# Altium PCB RTL8316_STAND.PcbDoc (part 3 of 4)
Units mm, origin at the board's own origin, x right, y up, seen from the top; angles counter-clockwise.
Board outline 155 x 217 mm, 4 copper layers (Top, Ground, Power, Bottom), stack 1.012 mm thick; 305 components, 396 nets, 1247 pads, 345 vias.
Unrouted connection lines stored in the file: 59.
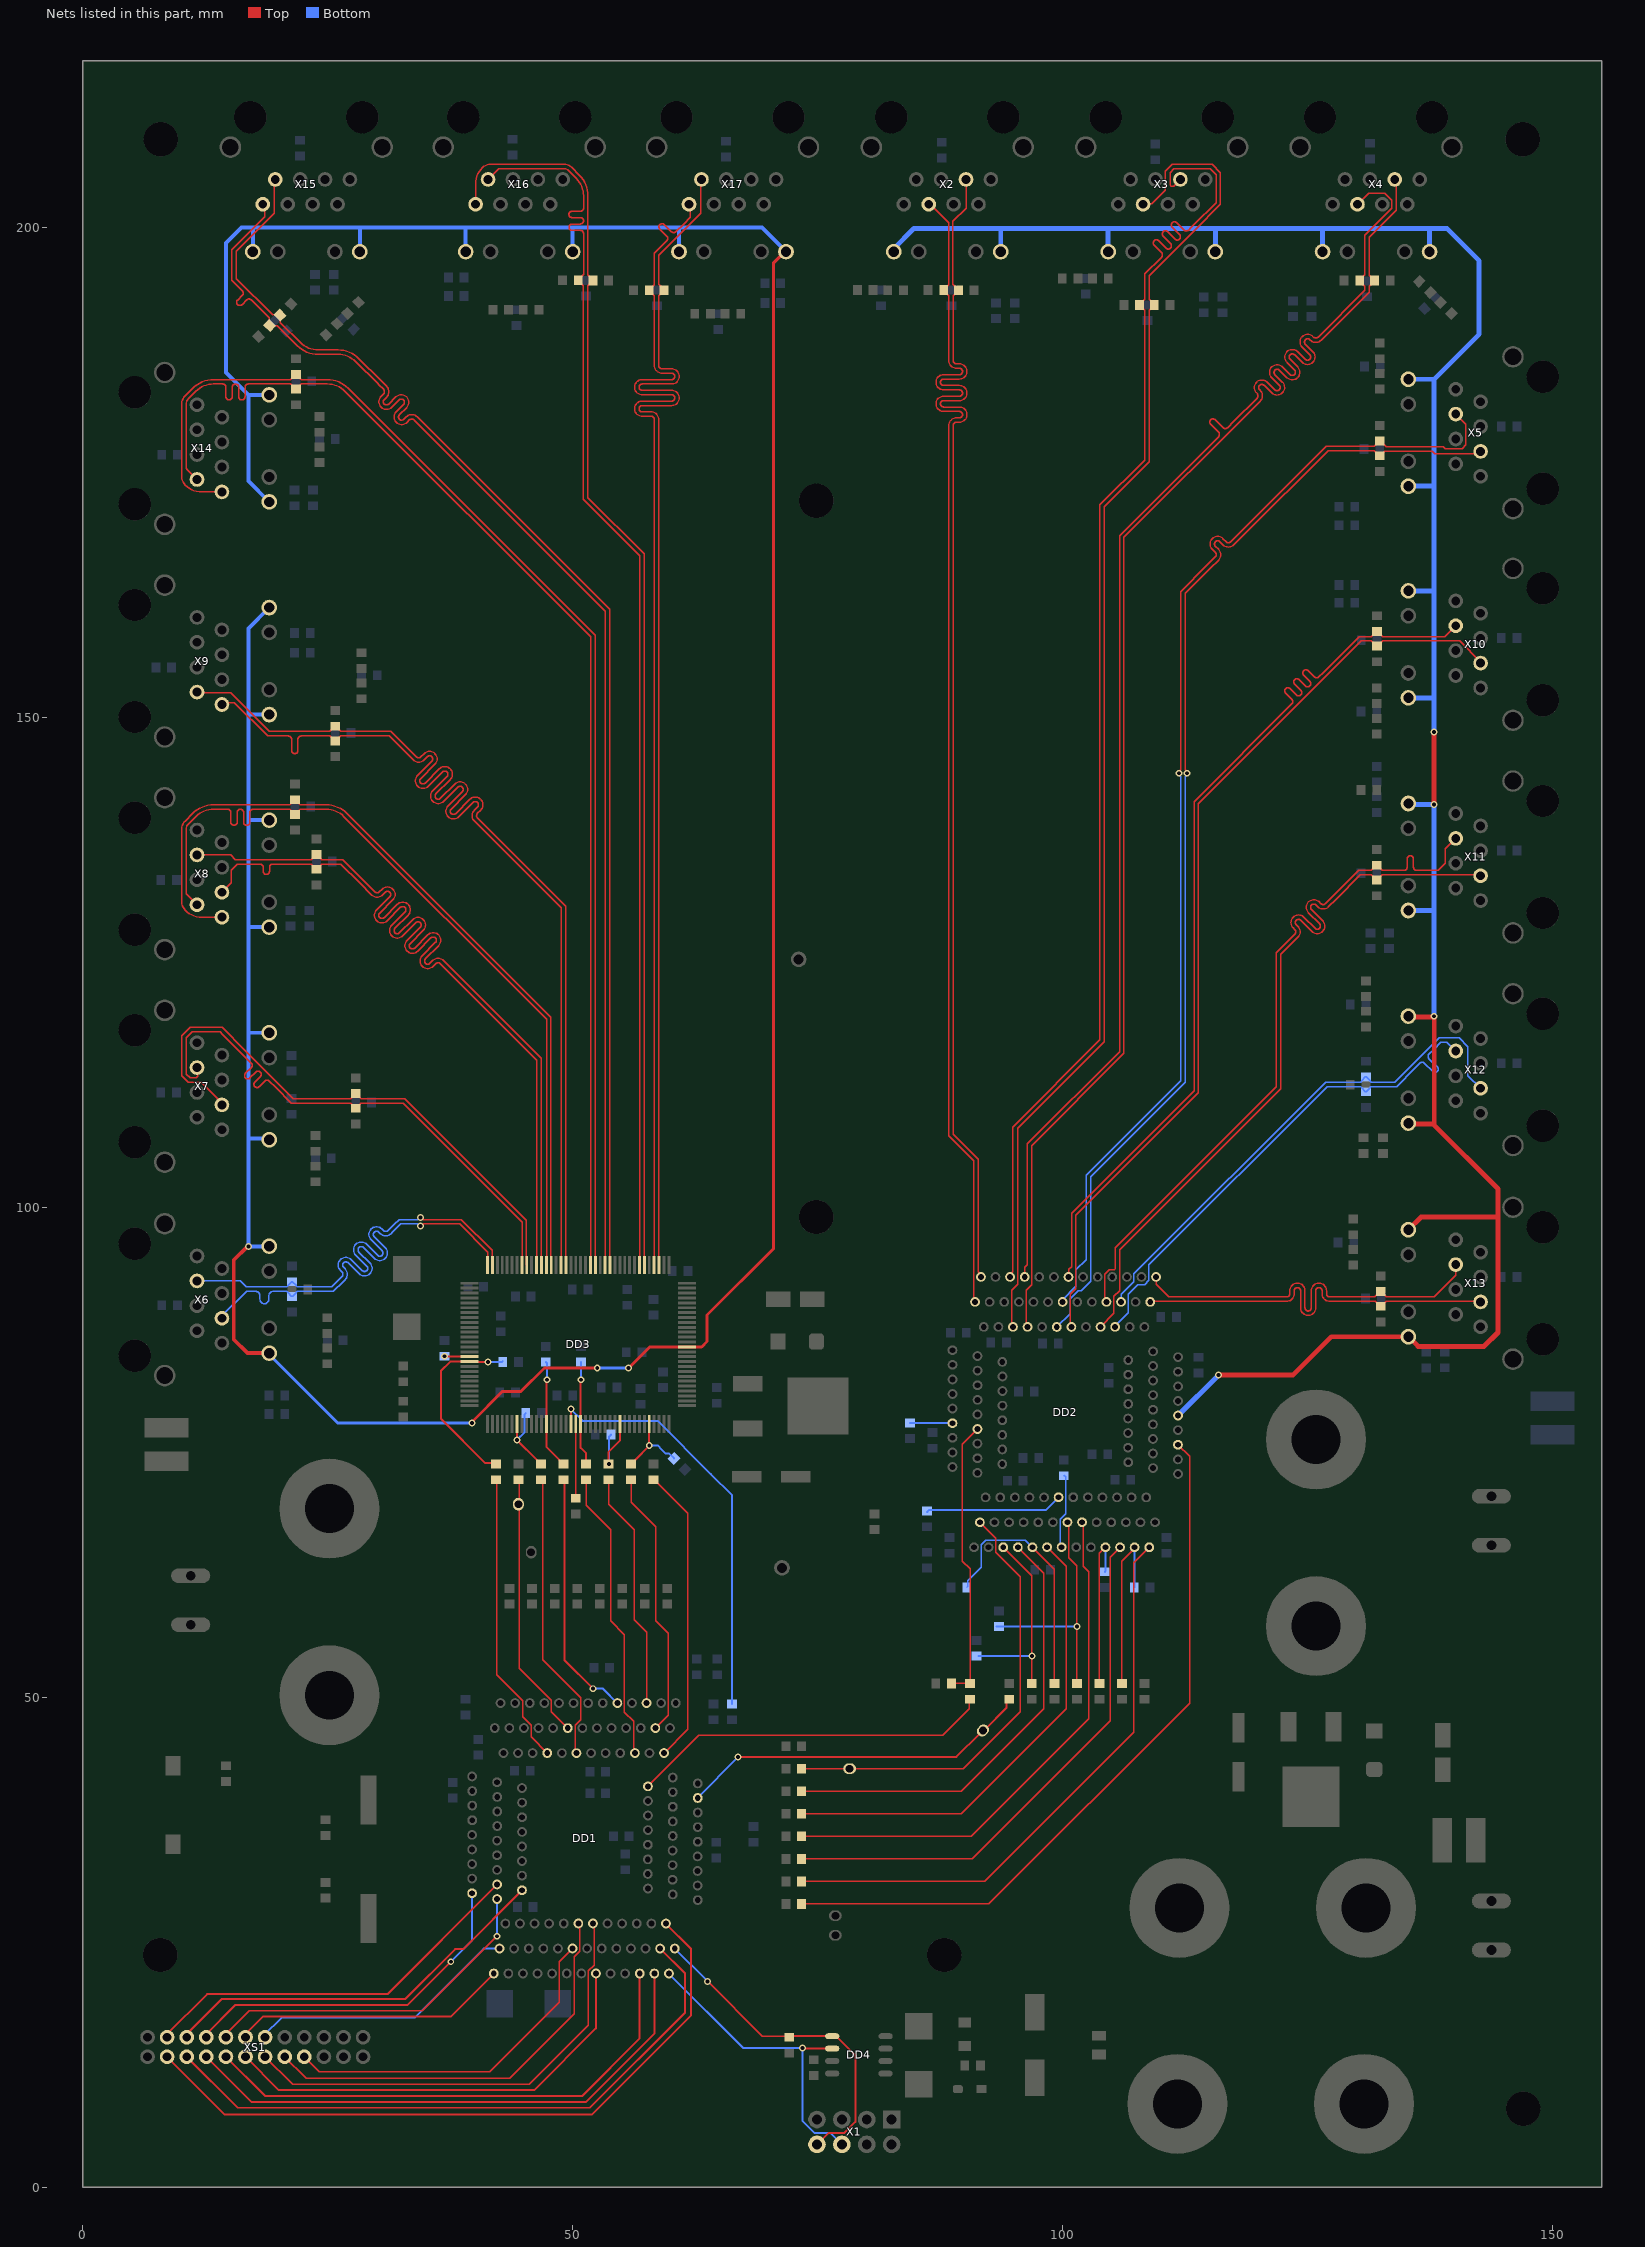
[diagram p5: the nets of this part, all layers, seen from the top]

## Via types
v1: diameter 0.7, hole 0.4, Top to Bottom, tented both sides, 332 vias
v2: diameter 1.2, hole 0.6, Top to Bottom, tented both sides, 11 vias
v3: diameter 0.9, hole 0.4, Top to Bottom, tented both sides, 2 vias

## Nets (pads, with @x,y where several pads share a name; then routed paths per layer and width w, separated by ;. In a path a pad name is that pad's centre, name@x,y a point inside that pad or via, vN(x,y) a via of type N, cw(c..) or ccw(c..) an arc to the next point about the centre after c; other vN are vias at no path point) (continued)
RX5_N: DD3.27 R104.1 X8.6 | length 85.1
  Top w0.15: X8.6@11.65,135.96 15.09,135.96 15.575,135.475 23.244,135.475 ccw(c23.244,135.7) 23.403,135.541 ccw(c23.35,135.594) 23.425,135.594 cw(c23.5,135.594) 23.447,135.647 23.765,135.965 cw(c23.85,135.879) R104.1@23.85,136 cw(c23.85,135.879) 23.935,135.965 24.253,135.647 cw(c24.2,135.594) 24.275,135.594 ccw(c24.35,135.594) 24.297,135.541 24.319,135.519 ccw(c24.425,135.625) 24.425,135.475 26.511,135.475 28.568,133.418 29.8,132.187 ccw(c30.029,132.417) 30.259,132.187 30.542,132.47 cw(c31.09,131.922) 31.638,132.47 cw(c31.09,131.922) 31.638,131.374 ; 31.637,131.373 30.295,130.03 ccw(c30.524,129.8) 30.295,129.57 ccw(c30.524,129.8) 30.754,129.57 32.098,130.914 cw(c32.646,130.366) 33.194,130.914 cw(c32.646,130.366) 33.194,129.818 ; 33.193,129.817 31.85,128.474 ccw(c32.08,128.245) 31.85,128.015 ccw(c32.08,128.245) 32.309,128.014 33.653,129.358 cw(c34.201,128.81) 34.749,129.358 cw(c34.201,128.81) 34.749,128.262 ; 34.749,128.261 33.406,126.919 ccw(c33.636,126.689) 33.406,126.459 ccw(c33.636,126.689) 33.865,126.459 35.209,127.803 cw(c35.757,127.255) 36.305,127.803 cw(c35.757,127.255) 36.305,126.707 ; 36.304,126.706 34.962,125.363 ccw(c35.191,125.133) 34.962,124.904 ccw(c35.191,125.133) 35.421,124.903 35.704,125.186 cw(c36.252,124.638) 36.8,125.186 37.012,124.974 46.775,115.211 46.775,94.125 DD3.27@46.8,94.1
RX5_P: DD3.28 R103.1 X8.3 | length 85.1
  Top w0.15: X8.3@14.19,132.15 15.165,133.125 15.165,134.415 15.775,135.025 17.35,135.025 18.075,135.025 cw(c18.075,134.7) 18.4,134.7 18.4,134.301 ccw(c18.725,134.301) 18.725,133.976 ccw(c18.725,134.301) 19.05,134.301 19.05,134.7 cw(c19.375,134.7) 19.375,135.025 20.65,135.025 23.244,135.025 cw(c23.244,134.8) 23.403,134.959 cw(c23.35,134.906) 23.425,134.906 ccw(c23.5,134.906) 23.447,134.853 R103.1@23.765,134.535 ; R103.1@23.765,134.535 ccw(c23.85,134.621) R103.1@23.85,134.5 ccw(c23.85,134.621) R103.1@23.935,134.535 ; R103.1@23.935,134.535 24.253,134.853 ccw(c24.2,134.906) 24.275,134.906 cw(c24.35,134.906) 24.297,134.959 24.319,134.981 cw(c24.425,134.875) 24.425,135.025 26.325,135.025 28.25,133.1 29.48,131.87 ccw(c30.029,132.417) 30.577,131.869 30.86,132.151 cw(c31.09,131.922) 31.32,132.151 cw(c31.09,131.922) 31.32,131.692 29.976,130.348 ccw(c30.524,129.8) 29.976,129.252 ccw(c30.524,129.8) 31.072,129.252 32.416,130.596 cw(c32.646,130.366) 32.876,130.596 cw(c32.646,130.366) 32.876,130.137 31.532,128.793 ccw(c32.08,128.245) 31.532,127.697 ccw(c32.08,128.245) 32.628,127.697 33.972,129.04 cw(c34.201,128.81) 34.431,129.04 cw(c34.201,128.81) 34.432,128.581 33.088,127.237 ccw(c33.636,126.689) 33.088,126.141 ccw(c33.636,126.689) 34.184,126.141 35.527,127.484 cw(c35.757,127.255) 35.987,127.484 cw(c35.757,127.255) 35.987,127.025 34.643,125.681 ccw(c35.191,125.133) 34.643,124.585 ccw(c35.191,125.133) 35.739,124.585 ; 35.74,124.586 36.022,124.868 cw(c36.252,124.638) 36.482,124.868 36.694,124.656 46.325,115.025 46.325,94.125 DD3.28@46.3,94.1
RX6: DD1.124 R57.1 TP3.1 | length 37
  Top w0.2: v1(66.85,43.9) 89.15,43.9 91.578,46.328 91.328,46.578 91.502,46.752 TP3.1@91.654,46.904 ; TP3.1@91.65,46.7 92.05,46.7 94.25,48.9 94.25,49.5 R57.1@94.55,49.8
  Bottom w0.2: DD1.124@62.75,39.715 62.75,39.757 66.85,43.857 v1(66.85,43.9)
RX6_N: DD3.31 R100.1 X7.6 | length 58.3
  Top w0.15: X7.6@11.65,114.26 11.723,114.187 11.723,113.373 11.55,113.2 10.95,113.2 10.55,113.6 10.55,117.3 11.15,117.9 14.014,117.9 14.232,117.682 16.532,115.382 16.682,115.232 17.194,114.719 cw(c16.965,114.489) 17.194,114.26 16.593,113.658 ccw(c16.823,113.429) 16.593,113.199 ccw(c16.823,113.429) 17.053,113.199 17.654,113.8 cw(c17.884,113.57) 18.114,113.8 cw(c17.884,113.57) 18.114,113.34 17.546,112.772 ccw(c17.775,112.542) 17.546,112.313 ccw(c17.775,112.542) 18.005,112.313 18.573,112.881 cw(c18.803,112.651) 19.033,112.881 19.682,112.232 21.289,110.625 27.244,110.625 cw(c27.244,110.4) 27.403,110.559 cw(c27.35,110.506) 27.425,110.506 ccw(c27.5,110.506) 27.447,110.453 27.765,110.135 ccw(c27.85,110.221) R100.1@27.85,110.1 ccw(c27.85,110.221) R100.1@27.935,110.135 ; R100.1@27.935,110.135 28.253,110.453 ccw(c28.2,110.506) 28.275,110.506 cw(c28.35,110.506) 28.297,110.559 ; 28.297,110.559 28.319,110.581 cw(c28.425,110.475) 28.425,110.625 32.689,110.625 44.825,98.489 44.825,94.125 DD3.31@44.8,94.1
RX6_P: DD3.30 R99.1 X7.3 | length 58.3
  Top w0.15: X7.3@14.19,110.45 14.19,110.66 12.1,112.75 10.764,112.75 10.1,113.414 10.1,117.486 10.964,118.35 14.2,118.35 16.532,116.018 16.85,115.7 21.475,111.075 27.244,111.075 ccw(c27.244,111.3) 27.403,111.141 ccw(c27.35,111.194) 27.425,111.194 cw(c27.5,111.194) 27.447,111.247 27.765,111.565 cw(c27.85,111.479) R99.1@27.85,111.6 cw(c27.85,111.479) R99.1@27.935,111.565 ; R99.1@27.935,111.565 28.253,111.247 cw(c28.2,111.194) 28.275,111.194 ccw(c28.35,111.194) 28.297,111.141 28.319,111.119 ccw(c28.425,111.225) 28.425,111.075 32.875,111.075 45.275,98.675 45.275,94.125 DD3.30@45.3,94.1
RX7: DD1.126 R64.1 | length 37.1
  Top w0.15: DD1.126@57.665,40.905 62.86,46.1 87.75,46.1 90.45,48.8 R64.1@90.45,49.871
RX7_N: DD3.37 R96.1 X6.6 | length 47.2
  Top w0.15: v1(34.45,98.95) 34.599,98.95 34.799,98.75 38.636,98.75 41.775,95.611 41.775,94.125 DD3.37@41.8,94.1
  Bottom w0.15: X6.6@11.65,92.485 16.065,92.485 16.675,91.875 20.744,91.875 ccw(c20.744,92.1) 20.903,91.941 ccw(c20.85,91.994) 20.925,91.994 cw(c21,91.994) 20.947,92.047 21.265,92.365 cw(c21.35,92.279) R96.1@21.35,92.4 cw(c21.35,92.279) 21.435,92.365 21.753,92.047 cw(c21.7,91.994) 21.775,91.994 ccw(c21.85,91.994) 21.797,91.941 21.819,91.919 ccw(c21.925,92.025) 21.925,91.875 25.389,91.875 26.232,92.718 26.444,92.93 ccw(c26.211,93.163) 26.443,93.396 ; 26.443,93.397 26.289,93.551 cw(c26.84,94.101) 26.288,94.651 26.291,94.654 cw(c26.84,94.101) 27.391,94.652 28.505,93.538 ccw(c28.737,93.771) 28.97,93.538 ccw(c28.737,93.771) 28.97,94.003 27.856,95.117 cw(c28.407,95.668) 27.855,96.218 27.857,96.221 cw(c28.407,95.668) 28.958,96.219 30.072,95.105 ccw(c30.304,95.338) 30.537,95.105 ccw(c30.304,95.338) 30.537,95.57 29.423,96.684 cw(c29.974,97.235) 29.421,97.785 29.424,97.788 cw(c29.974,97.235) 30.525,97.786 30.679,97.631 ccw(c30.912,97.864) 31.145,97.631 31.405,97.891 31.639,98.125 31.785,98.271 32.264,98.75 34.101,98.75 34.301,98.95 v1(34.45,98.95)
RX7_P: DD3.38 R95.1 X6.3 | length 46.7
  Top w0.15: v1(34.45,98.1) 34.599,98.1 34.799,98.3 38.45,98.3 41.325,95.425 41.325,94.125 DD3.38@41.3,94.1
  Bottom w0.15: X6.3@14.19,88.675 14.19,88.94 16.65,91.4 16.675,91.425 17.625,91.425 cw(c17.625,90.975) 18.075,90.975 18.075,90.605 ccw(c18.525,90.605) 18.525,90.155 ccw(c18.525,90.605) 18.975,90.605 18.975,90.975 cw(c19.425,90.975) 19.425,91.425 20.744,91.425 20.775,91.423 cw(c20.744,91.2) 20.85,91.398 cw(c20.744,91.2) 20.903,91.359 cw(c20.85,91.306) 20.925,91.306 ccw(c21,91.306) 20.947,91.253 21.265,90.935 ccw(c21.35,91.021) R95.1@21.35,90.9 ccw(c21.35,91.021) 21.435,90.935 21.753,91.253 ccw(c21.7,91.306) 21.775,91.306 cw(c21.85,91.306) 21.797,91.359 21.819,91.381 cw(c21.925,91.275) 21.925,91.425 25.575,91.425 26.55,92.4 26.762,92.612 ccw(c26.211,93.163) 26.828,93.639 26.828,93.648 26.763,93.713 ; 26.762,93.714 26.607,93.869 cw(c26.84,94.101) 26.607,94.334 cw(c26.84,94.101) 27.073,94.334 28.187,93.22 ccw(c28.737,93.771) 29.287,93.219 29.29,93.221 ccw(c28.737,93.771) 29.288,94.322 28.174,95.436 cw(c28.407,95.668) 28.174,95.901 cw(c28.407,95.668) 28.639,95.901 29.753,94.787 ccw(c30.304,95.338) 30.854,94.785 30.857,94.788 ccw(c30.304,95.338) 30.855,95.889 29.741,97.003 cw(c29.974,97.235) 29.741,97.468 cw(c29.974,97.235) 30.206,97.468 30.361,97.313 ccw(c30.912,97.864) 31.463,97.313 31.591,97.441 31.957,97.807 32.103,97.953 32.45,98.3 34.101,98.3 34.301,98.1 v1(34.45,98.1)
RX8: DD1.3 R48.1 | length 30.4
  Top w0.15: R48.1@58.25,72.2 58.3,72.2 58.675,71.825 61.75,68.75 61.75,46.735 DD1.3@59.315,44.3
RX8_N: DD2.2 R124.1 X13.6 | length 40.8
  Top w0.15: DD2.2@108.935,90.35 108.985,90.4 122.55,90.4 122.85,90.4 ccw(c122.85,91.175) 123.625,91.175 123.625,91.481 cw(c123.95,91.481) 124.275,91.481 124.275,89.737 ccw(c125.05,89.737) 125.825,89.737 125.825,91.481 cw(c126.15,91.481) 126.475,91.481 126.475,91.175 ccw(c127.25,91.175) 127.25,90.4 128.15,90.4 131.9,90.4 132.4,89.9 R124.1@132.45,89.9 132.5,89.9 133.025,90.425 142.565,90.425 X13.6@142.65,90.34
RX8_P: DD2.1 R123.1 X13.3 | length 40.9
  Top w0.15: DD2.1@109.53,92.9 109.53,92.12 110.8,90.85 118.582,90.85 122.55,90.85 122.85,90.85 ccw(c122.85,91.175) 123.175,91.175 123.175,91.481 cw(c123.95,91.481) 124.725,91.481 124.725,89.737 ccw(c125.05,89.737) 125.375,89.737 125.375,91.481 cw(c126.15,91.481) 126.925,91.481 126.925,91.175 ccw(c127.25,91.175) 127.25,90.85 128.15,90.85 131.85,90.85 132.4,91.4 R123.1@132.45,91.4 132.5,91.4 133.025,90.875 137.925,90.875 140.11,93.06 X13.3@140.11,94.15
RX9: DD1.5 R54.1 | length 27.5
  Top w0.15: R54.1@55.95,72.2 55.95,69.9 58.45,67.4 58.45,57.8 59.745,56.505 59.745,48.17 DD1.5@58.425,46.85
RX9_N: DD2.8 R120.1 X12.6 | length 53.1
  Bottom w0.15: DD2.8@105.955,90.35 105.955,91.105 107.275,92.425 107.275,93.225 126.825,112.775 130.438,112.775 130.526,112.863 130.526,112.925 130.901,113.3 R120.1@130.951,113.3 131.001,113.3 131.376,112.925 131.376,112.862 131.464,112.775 133.888,112.775 138.414,117.3 139.396,117.3 140.45,117.3 141.35,116.4 141.35,113.44 X12.6@142.65,112.14
RX9_P: DD2.9 R119.1 X12.3 | length 52.9
  Bottom w0.15: DD2.9@105.355,87.8 105.355,87.905 106.7,89.25 106.7,91.15 107.65,92.1 108.35,92.1 108.805,92.555 108.805,94.119 127.011,112.325 130.437,112.325 130.525,112.237 130.525,112.175 130.9,111.8 R119.1@130.95,111.8 131,111.8 131.375,112.175 131.375,112.237 131.463,112.325 134.075,112.325 135.95,114.2 136.463,114.713 cw(c136.692,114.483) 136.922,114.713 137.771,113.864 ccw(c138.001,114.094) 138.231,113.864 ccw(c138.001,114.094) 138.231,114.323 137.382,115.172 cw(c137.612,115.402) 137.382,115.632 137.85,116.1 138.6,116.85 139.21,116.85 X12.3@140.11,115.95
RX10: DD1.7 R59.1 | length 24.4
  Top w0.15: R59.1@53.65,72.2 53.65,69.7 56.25,67.1 56.25,57.9 57.53,56.62 DD1.7@57.53,49.4
RX10_N: DD2.12 R116.1 X11.6 | length 76.1
  Top w0.15: DD2.12@103.865,87.8 105.23,89.165 105.23,90.905 105.825,91.5 105.825,95.675 122.25,112.1 122.25,125.8 123.8,127.35 124.012,127.562 ccw(c123.464,128.11) 124.012,128.658 123.838,128.832 cw(c124.069,129.061) 123.839,129.291 cw(c124.069,129.061) 124.299,129.29 ; 124.3,129.29 125.43,128.159 ; 125.431,128.159 ccw(c125.979,128.706) 126.527,128.158 ccw(c125.979,128.706) 126.593,129.179 126.593,129.188 126.528,129.254 125.394,130.387 cw(c125.624,130.617) 125.395,130.847 cw(c125.624,130.617) 125.855,130.846 ; 125.855,130.846 126.026,130.674 ccw(c126.575,131.221) 127.123,130.673 127.9,131.45 130.375,133.925 131.475,133.925 132,133.4 R116.1@132.05,133.4 132.1,133.4 132.625,133.925 142.565,133.925 X11.6@142.65,133.84
RX10_P: DD2.11 R115.1 X11.3 | length 76.4
  Top w0.15: DD2.11@104.465,90.35 104.302,90.513 104.302,90.856 104.295,90.863 104.295,93.16 104.76,93.625 105.287,93.625 105.375,93.713 105.375,95.861 121.8,112.286 121.8,125.986 123.482,127.668 123.694,127.88 ccw(c123.464,128.11) 123.694,128.34 123.522,128.512 ; 123.521,128.513 cw(c124.069,129.061) 123.521,129.609 cw(c124.069,129.061) 124.542,129.675 124.551,129.675 124.616,129.61 ; 124.617,129.609 125.75,128.476 ccw(c125.979,128.706) 126.209,128.476 ccw(c125.979,128.706) 126.209,128.937 125.077,130.068 cw(c125.624,130.617) 125.076,131.165 cw(c125.624,130.617) 126.097,131.231 126.106,131.231 126.172,131.165 ; 126.172,131.165 126.346,130.992 ccw(c126.575,131.221) 126.805,130.992 127.582,131.768 130.189,134.375 131.477,134.375 132.001,134.9 R115.1@132.051,134.9 132.101,134.9 132.626,134.375 134.75,134.375 134.825,134.375 ccw(c134.825,134.7) 135.15,134.7 135.15,135.55 cw(c135.475,135.55) 135.475,135.875 cw(c135.475,135.55) 135.8,135.55 135.8,134.7 ccw(c136.125,134.7) 136.125,134.375 136.85,134.375 138.325,134.375 139.05,135.1 139.05,136.59 X11.3@140.11,137.65
RX11: DD1.9 R66.1 | length 30.5
  Top w0.15: R66.1@51.35,72.2 51.35,69.6 53.75,67.2 ; 53.35,67.6 53.85,67.1 53.85,57.8 55.275,56.375 55.275,48.475 56.21,47.54 56.21,44.425 DD1.9@56.335,44.3
RX11_N: DD2.18 R112.1 X10.6 | length 96
  Top w0.15: DD2.18@100.885,87.79 100.75,87.925 100.75,91.1 101.35,91.7 101.35,99.2 113.85,111.7 113.85,141.2 123.65,151 130.451,157.801 131.5,157.801 132.025,157.275 132.125,157.275 132.65,157.8 135.94,157.8 140.499,157.8 142.65,155.649 X10.6@142.65,155.54
RX11_P: DD2.19 R111.1 X10.3 | length 96
  Top w0.15: DD2.19@100.59,92.89 100.634,92.934 100.634,93.684 100.9,93.95 100.9,99.386 113.4,111.886 113.4,141.386 123.332,151.318 123.385,151.371 ccw(c123.155,151.601) 123.385,151.831 122.746,152.469 cw(c122.976,152.699) 122.746,152.929 cw(c122.976,152.699) 123.206,152.929 123.844,152.29 ccw(c124.074,152.52) 124.304,152.29 ccw(c124.074,152.52) 124.304,152.75 123.666,153.388 cw(c123.895,153.618) 123.666,153.848 cw(c123.895,153.618) 124.125,153.848 124.764,153.21 ccw(c124.994,153.44) 125.223,153.21 ccw(c124.994,153.44) 125.223,153.669 124.595,154.298 cw(c124.825,154.528) 124.595,154.757 cw(c124.825,154.528) 125.054,154.757 125.683,154.129 ccw(c125.913,154.359) 126.143,154.129 126.584,154.57 130.264,158.251 131.502,158.251 132.027,158.775 132.127,158.775 132.652,158.25 135.753,158.25 139.01,158.25 X10.3@140.11,159.35
RX12: DD1.13 R47.1 | length 25.8
  Top w0.2: R47.1@49.15,72.4 49.15,53.796 v1(52.078,50.868)
  Bottom w0.2: v1(52.078,50.868) 53.082,50.868 DD1.13@54.55,49.4
RX12_N: DD2.21 R92.1 X5.6 | length 119.6
  Top w0.15: v1(112.7,144.3) 112.7,144.449 112.5,144.649 112.5,162.65 115.043,165.193 115.899,166.049 ccw(c115.351,166.597) 115.899,167.145 115.578,167.466 cw(c115.808,167.696) 115.578,167.926 cw(c115.808,167.696) 116.039,167.925 ; 116.039,167.924 116.358,167.606 ; 116.358,167.606 ccw(c116.907,168.153) 117.455,167.605 118.445,168.595 127.075,177.225 131.775,177.225 132.3,176.7 R92.1@132.35,176.7 132.4,176.7 132.855,177.155 137.737,177.155 137.992,176.9 142.41,176.9 X5.6@142.65,177.14
  Bottom w0.15: DD2.21@99.395,87.79 100.75,89.145 100.75,90.675 101.575,91.5 101.9,91.5 102.845,92.445 102.845,94.317 102.85,94.322 102.85,103.1 112.5,112.75 112.5,143.951 112.7,144.151 v1(112.7,144.3)
RX12_P: DD2.20 R91.1 X5.3 | length 119.3
  Top w0.15: v1(111.85,144.3) 111.85,144.449 112.05,144.649 112.05,144.663 112.05,162.836 114.725,165.512 115.581,166.367 ccw(c115.351,166.597) 115.581,166.827 115.261,167.147 cw(c115.808,167.696) 115.26,168.244 cw(c115.808,167.696) 116.281,168.31 116.29,168.31 116.356,168.244 116.677,167.923 ccw(c116.907,168.153) 117.137,167.923 118.127,168.913 126.889,177.675 131.777,177.675 132.301,178.2 R91.1@132.351,178.2 132.401,178.2 132.996,177.605 138.856,177.605 139.026,177.435 140.785,177.435 141.15,177.8 141.15,179.91 X5.3@140.11,180.95
  Bottom w0.15: DD2.20@99.995,90.34 99.995,90.556 101.355,91.916 101.355,93.605 102.4,94.65 102.4,103.286 112.05,112.936 112.05,143.951 111.85,144.151 v1(111.85,144.3)
RX13: DD1.21 R53.1 | length 29.8
  Top w0.15: R53.1@46.75,72.2 R53.1@46.85,72.1 ; R53.1@46.95,72.1 46.95,53.805 50.805,49.95 50.805,47.695 50.25,47.14 50.25,44.415 DD1.21@50.375,44.29
RX13_N: DD2.27 R88.1 X4.6 | length 145
  Top w0.15: DD2.27@96.415,87.8 96.29,87.925 96.29,91.54 96.85,92.1 96.85,106.3 106.25,115.7 106.25,168.362 119.508,181.62 120.157,182.268 ccw(c119.609,182.816) 120.157,183.364 120.096,183.425 cw(c120.327,183.654) 120.097,183.884 cw(c120.327,183.654) 120.557,183.883 121.32,183.121 ; 121.32,183.12 ccw(c121.869,183.668) 122.417,183.12 ccw(c121.869,183.668) 122.483,184.141 122.483,184.15 122.417,184.215 ; 122.417,184.216 121.652,184.98 cw(c121.882,185.21) 121.652,185.44 cw(c121.882,185.21) 122.113,185.439 122.875,184.676 ; 122.876,184.676 ccw(c123.424,185.223) 123.972,184.675 ccw(c123.424,185.223) 124.038,185.696 124.038,185.705 123.973,185.771 ; 123.972,185.771 123.208,186.536 cw(c123.438,186.765) 123.208,186.995 cw(c123.438,186.765) 123.668,186.995 124.431,186.232 ; 124.431,186.231 ccw(c124.98,186.779) 125.528,186.231 ccw(c124.98,186.779) 125.594,187.252 125.594,187.261 125.528,187.326 ; 125.528,187.327 124.763,188.092 cw(c124.993,188.321) 124.764,188.551 cw(c124.993,188.321) 125.224,188.55 125.282,188.492 ccw(c125.831,189.039) 126.379,188.491 127.369,189.481 131.293,193.405 131.293,193.99 131.824,194.521 R88.1@131.824,194.571 131.824,194.621 131.3,195.144 131.3,198.406 131.3,198.55 131.3,199.025 134.045,201.77 134.045,204.745 X4.6@133.89,204.9
RX13_P: DD2.28 R87.1 X4.3 | length 144.8
  Top w0.15: DD2.28@96.12,92.9 96.12,93.87 96.4,94.15 96.4,106.486 105.8,115.886 105.8,168.548 115.851,178.599 115.904,178.652 ccw(c115.674,178.882) 115.904,179.112 115.105,179.91 cw(c115.335,180.14) 115.105,180.37 cw(c115.335,180.14) 115.565,180.37 116.364,179.571 ccw(c116.593,179.801) 116.823,179.571 117.47,180.218 119.838,182.587 ccw(c119.609,182.816) 119.838,183.046 119.78,183.105 ; 119.779,183.105 cw(c120.327,183.654) 119.779,184.202 cw(c120.327,183.654) 120.8,184.268 120.809,184.268 120.874,184.203 ; 120.875,184.202 121.639,183.437 ccw(c121.869,183.668) 122.099,183.438 ccw(c121.869,183.668) 122.098,183.898 121.335,184.661 ; 121.335,184.661 cw(c121.882,185.21) 121.334,185.758 cw(c121.882,185.21) 122.355,185.824 122.364,185.824 122.43,185.758 123.195,184.993 ccw(c123.424,185.223) 123.654,184.993 ccw(c123.424,185.223) 123.654,185.454 122.891,186.216 ; 122.89,186.217 cw(c123.438,186.765) 122.89,187.313 cw(c123.438,186.765) 123.911,187.379 123.92,187.379 123.985,187.314 ; 123.986,187.313 124.751,186.549 ccw(c124.98,186.779) 125.21,186.549 ccw(c124.98,186.779) 125.209,187.009 124.447,187.772 ; 124.446,187.772 cw(c124.993,188.321) 124.445,188.869 cw(c124.993,188.321) 125.466,188.935 125.476,188.935 125.541,188.87 ; 125.541,188.869 125.601,188.809 ccw(c125.831,189.039) 126.061,188.809 130.843,193.591 130.843,193.99 130.312,194.521 R87.1@130.312,194.571 130.312,194.621 130.85,195.158 130.85,198.592 130.85,199.211 133.595,201.956 133.595,202.764 133.254,203.104 132.859,203.5 131.22,203.5 X4.3@130.08,202.36
RX14: DD1.23 R60.1 TP4.1 | length 27.5
  Top w0.15: R60.1@44.55,72.3 44.55,52.975 47.825,49.7 47.825,48.5 DD1.23@49.485,46.84
RX14_N: DD2.31 R84.1 X3.6 | length 138
  Top w0.15: DD2.31@94.63,92.9 94.63,93.13 94.9,93.4 94.9,108.186 103.8,117.086 103.8,171.686 108.375,176.261 108.375,191.525 107.85,192.05 R84.1@107.85,192.1 107.85,192.15 108.375,192.675 108.375,195.261 110.032,196.918 110.085,196.971 ccw(c109.855,197.201) 110.085,197.431 109.335,198.18 cw(c109.565,198.41) 109.335,198.64 cw(c109.565,198.41) 109.795,198.64 110.544,197.89 ccw(c110.774,198.12) 111.004,197.89 ccw(c110.774,198.12) 111.004,198.35 110.255,199.1 cw(c110.484,199.329) 110.255,199.559 cw(c110.484,199.329) 110.714,199.559 111.464,198.81 ccw(c111.694,199.04) 111.923,198.81 ccw(c111.694,199.04) 111.923,199.269 111.174,200.019 cw(c111.404,200.249) 111.174,200.478 cw(c111.404,200.249) 111.633,200.478 112.383,199.729 ccw(c112.613,199.959) 112.843,199.729 113.079,199.965 113.132,200.018 113.382,200.268 115.65,202.536 115.65,205.4 115.05,206 111.35,206 110.95,205.6 110.95,204.288 111.038,204.2 111.31,204.2 X3.6@112.01,204.9
RX14_P: DD2.30 R83.1 X3.3 | length 138.8
  Top w0.15: DD2.30@94.925,87.8 94.8,87.925 94.8,91.55 95.395,92.145 95.395,108.045 104.25,116.9 104.25,171.5 108.825,176.075 108.825,180.5 108.825,188.2 108.825,191.525 109.35,192.05 R83.1@109.35,192.1 109.35,192.15 108.825,192.675 108.825,194.502 ; X3.3@108.2,202.36 108.277,202.437 109.087,202.437 110.45,203.8 110.45,205.736 111.164,206.45 115.236,206.45 116.1,205.586 116.1,202.35 113.45,199.7 108.825,195.075 ; 108.827,194.5 108.825,194.502 ; 108.825,194.502 108.825,195.075 ; 108.825,194.502 108.825,195.075
RX15: DD1.27 R65.1 | length 30.1
  Top w0.15: R65.1@42.25,72.3 42.25,52.295 44.885,49.66 44.885,48.005 45.74,47.15 45.74,45.955 DD1.27@47.395,44.3
RX15_N: DD2.37 R80.1 X2.6 | length 125
  Top w0.15: X2.6@90.13,204.9 90.13,201.98 88.8,200.65 88.8,197.036 88.8,194.2 89.35,193.65 89.35,193.55 88.824,193.024 88.824,186.7 88.824,186.4 ccw(c89.149,186.4) 89.149,186.075 89.452,186.075 cw(c89.452,185.3) 90.227,185.3 cw(c89.452,185.3) 89.452,184.525 87.845,184.525 ccw(c87.845,184.2) 87.52,184.2 ccw(c87.845,184.2) 87.845,183.875 89.452,183.875 cw(c89.452,183.1) 90.227,183.1 cw(c89.452,183.1) 89.452,182.325 87.845,182.325 ccw(c87.845,182) 87.52,182 ccw(c87.845,182) 87.845,181.675 89.452,181.675 cw(c89.452,180.9) 90.227,180.9 cw(c89.452,180.9) 89.452,180.125 89.149,180.125 ccw(c89.149,179.8) 88.824,179.8 88.824,178.6 88.824,107.462 91.375,104.911 91.375,93.405 91.65,93.13 DD2.37@91.65,92.9
RX15_P: DD2.38 R79.1 X2.3 | length 125.3
  Top w0.15: X2.3@86.32,202.36 86.49,202.36 88.35,200.5 88.35,196.85 88.35,194.151 87.85,193.651 87.85,193.551 88.374,193.027 88.374,186.7 88.374,186.4 ccw(c89.149,186.4) 89.149,185.625 89.452,185.625 cw(c89.452,185.3) 89.777,185.3 cw(c89.452,185.3) 89.452,184.975 87.845,184.975 ccw(c87.845,184.2) 87.07,184.2 ccw(c87.845,184.2) 87.845,183.425 89.452,183.425 cw(c89.452,183.1) 89.777,183.1 cw(c89.452,183.1) 89.452,182.775 87.845,182.775 ccw(c87.845,182) 87.07,182 ccw(c87.845,182) 87.845,181.225 89.452,181.225 cw(c89.452,180.9) 89.777,180.9 cw(c89.452,180.9) 89.452,180.575 89.149,180.575 ccw(c89.149,179.8) 88.374,179.8 88.374,178.6 88.374,107.276 90.925,104.725 90.925,90.48 DD2.38@91.055,90.35
RXD0(1): DD3.98 R41.2 R54.2 | length 8
  Top w0.2: R54.2@55.95,73.8 56,73.8 56.35,74.15 56.35,74.2 57.8,75.65 DD3.98@57.8,77.9
  Bottom w0.2: v1(57.8,75.7) 58.649,75.7 59.1,75.249 59.1,75.239 59.451,74.887 59.813,74.887 R41.2@60.334,74.366
RXD0(1).1: DD2.98 R42.2 R52.2 | length 18.6
  Top w0.15: R52.2@106.05,51.4 106.05,63.9 107.34,65.19 DD2.98@107.34,65.3
  Bottom w0.2: R42.2@107.3,61.2 107.34,61.24 DD2.98@107.34,65.3
RXD0(2): DD3.92 R37.2 R59.2 | length 7.7
  Top w0.2: v1(53.7,73.8) R59.2@53.65,73.8 53.65,75.037 54.8,76.188 DD3.92@54.8,77.9
  Bottom w0.2: v1(53.7,73.8) 53.7,76.6 R37.2@53.9,76.8
RXD0(2).1: DD2.92 R38.2 R58.2 | length 16.7
  Top w0.15: R58.2@103.75,51.4 103.75,64.69 DD2.92@104.36,65.3
  Bottom w0.2: R38.2@104.3,62.8 104.36,62.86 DD2.92@104.36,65.3
RXD0(3): DD3.84 R3.2 R66.2 | length 10.6
  Top w0.2: v1(50.85,82.4) 50.8,82.35 DD3.84@50.8,77.9 50.8,75.45 51.35,74.9 R66.2@51.35,73.8
  Bottom w0.2: v1(50.85,82.4) R3.2@50.85,84.2
RXD0(3).1: DD2.84 R4.2 R63.2 | length 25.1
  Top w0.15: DD2.84@100.485,67.86 100.629,67.716 100.629,64.221 101.45,63.4 R63.2@101.45,51.4
  Bottom w0.2: R4.2@93.25,57.2 v1(101.45,57.2)
RXD0(4): DD3.77 R7.2 R47.2 | length 11.2
  Top w0.2: v1(47.35,82.4) 47.3,82.35 DD3.77@47.3,77.9 47.3,75.55 48.65,74.2 48.65,74.15 49,73.8 R47.2@49.05,73.8
  Bottom w0.2: R7.2@47.25,84.2 47.35,84.1 v1(47.35,82.4)
RXD0(4).1: DD2.77 R8.2 R46.2 | length 25.5
  Top w0.15: DD2.77@96.91,65.3 99.15,63.06 R46.2@99.15,51.4
  Bottom w0.15: R8.2@90.2,61.2 90.283,61.283 90.283,61.883 91.675,63.275 91.675,65.56 92.14,66.025 96.185,66.025 DD2.77@96.91,65.3
RXD0(5): DD3.71 R1.2 R53.2 | length 8.3
  Top w0.2: DD3.71@44.3,77.9 v1(44.3,76.25) 46.35,74.2 46.35,74.15 46.7,73.8 R53.2@46.75,73.8
  Bottom w0.2: v1(44.3,76.25) 45.078,77.028 45.078,78.878 R1.2@45.2,79
RXD0(5).1: DD2.71 R2.2 R51.2 | length 20.6
  Top w0.15: DD2.71@93.93,65.3 96.85,62.38 v1(96.85,54.2) R51.2@96.85,51.4
  Bottom w0.2: R2.2@91.4,54.2 v1(96.85,54.2)
RXD0(7): DD3.55 R11.2 R65.2 | length 19.2
  Top w0.2: v1(41.35,84.2) 41.325,84.225 39.475,84.225 DD3.55@39.45,84.25 37.5,84.25 36.55,83.3 36.55,78.4 41.05,73.9 42.05,73.9 R65.2@42.15,73.8
  Bottom w0.2: v1(41.35,84.2) 42.75,84.2 R11.2@42.85,84.3
RXD0(7).1: DD2.55 R12.2 R64.2 | length 28.8
  Top w0.15: R12.2@88.65,51.4 R64.2@90.55,51.4 90.55,63.1 89.75,63.9 89.75,75.82 DD2.55@91.3,77.37
RXD1(3): DD3.83 R34.2 | length 7.7
  Top w0.2: R34.2@50.2,70.2 R34.2@50.3,70.3 DD3.83@50.3,77.9
RXD1(3).1: DD2.83 R33.2 | length 7.7
  Bottom w0.15: DD2.83@99.89,65.31 99.76,65.44 99.76,68.16 100.31,68.71 100.31,72.49 R33.2@100.13,72.67
RXD1(7): DD3.54 R16.2 | length 2.6
  Top w0.2: v1(36.9,84.8) 36.925,84.775 39.425,84.775 DD3.54@39.45,84.75
RXD1(7).1: DD2.54 R15.2 | length 4.4
  Bottom w0.2: R15.2@84.4,78 84.435,77.965 DD2.54@88.75,77.965
SC_ST(1): DD3.115 X6.9 X6.12 X7.9 X7.12 X8.9 X8.12 X9.9 X9.12 X14.9 X14.12 X15.9 X15.12 X16.9 X16.12 X17.9 X17.12 | length 360.8
  Top w0.3: X6.12@19.002,96.018 X6.12@19.02,96.035 ; v1(39.7,78) 39.7,78.1 42.816,81.216 44.716,81.216 47.1,83.6 v1(52.5,83.6) ; v1(55.7,83.6) 57.85,85.75 DD3.115@61.65,85.75 63.15,85.75 63.7,86.3 63.7,89 70.5,95.8 70.5,196.4 71.63,197.53 X17.12@71.76,197.53
  Top w0.4: v1@16.917,96.018 v1(16.9,96) 16.8,96 15.4,94.6 15.4,86.5 16.785,85.115 X6.9@19.02,85.115
  Bottom w0.3: X6.9@19.02,85.115 19.02,84.98 26,78 v1(39.7,78) ; v1(52.5,83.6) v1(55.7,83.6)
  Bottom w0.4: v1(16.9,96) 16.91,96.01 16.91,107 ; v1@16.917,96.018 X6.12@19.002,96.018 ; X15.9@17.345,197.53 17.345,200 ; X7.9@19.02,106.89 18.91,107 16.91,107 ; X7.12@19.02,117.81 16.91,117.81 ; X8.9@19.02,128.59 16.99,128.59 16.9,128.5 ; X8.12@19.02,139.51 16.91,139.51 16.9,139.5 ; X9.9@19.02,150.29 16.91,150.29 16.9,150.3 ; X9.12@19.02,161.21 16.9,159.09 16.9,150.3 ; X14.9@19.02,171.99 16.9,174.11 16.9,182.9 ; X14.12@19.02,182.91 16.91,182.91 16.9,182.9 ; X15.12@28.265,197.53 28.265,199.935 28.2,200 ; X16.9@39.065,197.53 39.065,199.965 39.1,200 ; X16.12@49.985,197.53 49.985,199.985 50,200 ; X17.9@60.84,197.53 60.84,199.94 60.9,200 ; X17.12@71.76,197.53 69.29,200 60.9,200 ; 16.9,128.5 16.9,117.8 16.91,117.81 ; 16.9,128.5 16.9,139.5 ; 16.9,139.5 16.9,150.3 ; 16.9,182.9 14.6,185.2 14.6,198.4 16.2,200 17.345,200 ; 16.91,107 16.91,117.81 ; 17.345,200 28.2,200 ; 28.2,200 39.1,200 ; 39.1,200 50,200 ; 50,200 60.9,200
SC_ST(1).1: DD2.115 X2.9 X2.12 X3.9 X3.12 X4.9 X4.12 X5.9 X5.12 X10.9 X10.12 X11.9 X11.12 X12.9 X12.12 X13.9 X13.12 | length 256
  Top w0.5: v1(115.9,82.9) 123.523,82.9 127.413,86.79 X13.12@135.28,86.79 136.27,85.8 143,85.8 144.423,87.223 144.423,99 ; X13.9@135.28,97.71 136.57,99 144.423,99 ; X12.12@135.28,108.59 135.354,108.516 137.923,108.516 v1@137.923,119.477 ; X12.9@135.28,119.51 135.359,119.431 137.75,119.431 137.819,119.5 v1(137.9,119.5) ; 137.784,108.516 144.423,101.877 144.423,99 ; v1(137.9,141.1) v1(137.9,148.5)
  Bottom w0.5: X2.9@82.76,197.53 82.76,197.833 84.827,199.9 93.7,199.9 ; X2.12@93.68,197.53 93.68,199.88 93.7,199.9 ; X3.9@104.64,197.53 104.64,199.86 104.6,199.9 ; DD2.115@111.77,78.745 115.9,82.875 v1(115.9,82.9) ; X3.12@115.56,197.53 115.6,197.57 115.6,199.9 ; X4.9@126.52,197.53 126.52,199.88 126.5,199.9 ; X11.12@135.28,130.29 137.89,130.29 137.9,130.3 ; X11.9@135.28,141.21 135.39,141.1 v1(137.9,141.1) 137.9,130.3 ; X10.12@135.28,151.99 137.878,151.99 137.9,151.968 ; X10.9@135.28,162.91 137.89,162.91 137.9,162.9 ; X5.12@135.28,173.59 135.285,173.595 137.895,173.595 ; X5.9@135.28,184.51 135.285,184.505 137.895,184.505 ; X4.12@137.44,197.53 137.44,199.84 137.5,199.9 ; v1(137.9,119.5) 137.9,130.3 ; v1(137.9,148.5) 137.9,151.968 ; 93.7,199.9 104.6,199.9 ; 104.6,199.9 115.6,199.9 ; 115.6,199.9 126.5,199.9 ; 126.5,199.9 137.5,199.9 ; 137.5,199.9 139.2,199.9 142.5,196.6 142.5,189.1 137.9,184.5 137.895,184.505 ; 137.895,173.595 137.895,184.505 ; 137.895,173.595 137.9,173.6 137.9,162.9 ; 137.9,151.968 137.9,162.9
SCAN_LEDC0: DD1.66 XS1.11 | length 27.7
  Bottom w0.2: XS1.11@18.475,15.5 20.275,17.3 33.85,17.3 40.9,24.35 DD1.66@42.525,24.35
SCAN_LEDC1: DD1.65 XS1.13 | length 28.1
  Top w0.2: XS1.13@16.475,15.5 18.375,17.4 37.53,17.4 DD1.65@41.93,21.8
SCAN_LEDC2: DD1.64 XS1.15 | length 35.8
  Top w0.2: XS1.15@14.475,15.5 16.975,18 34.65,18 v1(42.25,25.6)
  Bottom w0.2: v1(42.25,25.6) 42.265,25.615 42.265,29.385 DD1.64@42.28,29.4
SCAN_LEDC3: DD1.63 XS1.17 | length 36.1
  Top w0.2: XS1.17@12.475,15.5 15.575,18.6 33.15,18.6 v1(37.55,23)
  Bottom w0.2: v1(37.55,23) 39.73,25.18 DD1.63@39.73,29.995
SCAN_LEDC4: DD1.62 XS1.19 | length 40.5
  Top w0.2: XS1.19@10.475,15.5 14.175,19.2 32.901,19.2 38.001,24.3 38.82,24.3 DD1.62@44.815,30.295
SCAN_LEDC5: DD1.61 XS1.21 | length 40.2
  Top w0.2: XS1.21@8.475,15.5 12.675,19.7 31.09,19.7 DD1.61@42.28,30.89
SCAN_STSA0: DD1.100 XS1.22 | length 70.6
  Top w0.2: XS1.22@8.527,13.373 14.5,7.4 51.95,7.4 62.05,17.5 62.05,24.355 DD1.100@59.505,26.9
SCAN_STSA1: DD1.99 XS1.20 | length 64.7
  Top w0.2: XS1.20@10.527,13.373 15.8,8.1 51.75,8.1 61.45,17.8 61.45,21.815 DD1.99@58.915,24.35
SCAN_STSA2: DD1.98 XS1.18 | length 56.7
  Top w0.2: XS1.18@12.527,13.373 17.2,8.7 51.35,8.7 58.32,15.67 DD1.98@58.32,21.8
SCAN_STSA3: DD1.95 XS1.16 | length 53
  Top w0.2: XS1.16@14.527,13.373 18.6,9.3 50.95,9.3 56.83,15.18 DD1.95@56.83,21.8
SCAN_STSB0: DD1.86 XS1.14 | length 45.4
  Top w0.2: XS1.14@16.6,13.3 20,9.9 46.05,9.9 52.36,16.21 DD1.86@52.36,21.81
SCAN_STSB1: DD1.85 XS1.12 | length 47.4
  Top w0.15: XS1.12@18.527,13.373 21.4,10.5 45.55,10.5 51.595,16.545 51.595,22.07 52.19,22.665 52.19,26.775 DD1.85@52.055,26.91
SCAN_STSB2: DD1.82 XS1.10 | length 42.8
  Top w0.15: XS1.10@20.527,13.373 22.8,11.1 43.55,11.1 50.145,17.695 50.145,23.505 50.7,24.06 50.7,26.775 DD1.82@50.565,26.91
SCAN_STSB3: DD1.81 XS1.8 | length 35.7
  Top w0.15: XS1.8@22.527,13.373 24.1,11.8 41.55,11.8 48.615,18.865 48.615,23 DD1.81@49.975,24.36
SCL: DD1.101 DD4.6 X1.6 | length 32.6
  Top w0.2: v1(73.45,14.2) 73.482,14.167 DD4.6@76.443,14.167
  Top w0.3: DD4.6@76.443,14.167 DD4.6@76.868,14.167
  Bottom w0.2: DD1.101@59.81,21.8 67.41,14.2 v1@73.377,14.2 ; v1(73.45,14.2) 73.45,6.744 74.649,5.545 76.275,5.545 X1.6@77.46,4.36
SDA: DD1.102 DD4.5 R70.1 X1.8 | length 34.6
  Top w0.2: v1(63.75,21) 69.35,15.4 R70.1@72.213,15.4 ; R70.1@72.213,15.405 DD4.5@76.475,15.405 76.9,15.405 78.85,13.455 78.85,6.664 77.731,5.545 76.105,5.545 X1.8@74.92,4.36
  Bottom w0.2: DD1.102@60.405,24.35 60.405,24.348 63.75,21.003 v1(63.75,21)
SYNC_1: DD3.82 R40.1 | length 42.9
  Top w0.2: DD3.82@49.8,77.9 v1(49.8,79.4)
  Bottom w0.2: v1@49.81,79.39 51,78.2 58.65,78.2 64.084,72.766 66.25,70.6 R40.1@66.25,49.3
SYNC_2: DD2.82 R39.1 | length 14.1
  Bottom w0.2: R39.1@86.15,68.9 86.35,69.1 98.275,69.1 DD2.82@99.585,70.41
TX0: DD2.109 R6.1 | length 74.9
  Top w0.15: R6.1@73.35,28.9 92.45,28.9 112.95,49.4 112.95,74.575 DD2.109@111.76,75.765
TX0_N: DD3.3 R138.1 X17.2 | length 127.1
  Top w0.15: DD3.3@58.8,94.1 58.775,94.125 58.775,178.9 58.775,180.4 ccw(c58,180.4) 58,181.175 57.085,181.175 cw(c57.085,181.5) 56.76,181.5 cw(c57.085,181.5) 57.085,181.825 60.089,181.825 ccw(c60.089,182.6) 60.864,182.6 ccw(c60.089,182.6) 60.089,183.375 57.085,183.375 cw(c57.085,183.7) 56.76,183.7 cw(c57.085,183.7) 57.085,184.025 60.089,184.025 ccw(c60.089,184.8) 60.864,184.8 ccw(c60.089,184.8) 60.089,185.575 59.1,185.575 cw(c59.1,185.9) 58.775,185.9 58.775,186.2 58.775,190.975 58.775,193.025 59.3,193.55 R138.1@59.3,193.6 59.3,193.65 58.763,194.188 58.763,197.176 61.468,199.882 63.05,201.464 63.05,204.82 X17.2@63.13,204.9
TX0_P: DD3.4 R137.1 X17.1 | length 127.1
  Top w0.15: R137.1@58.153,194.003 57.871,193.721 ccw(c58.041,193.55) 57.8,193.55 58.325,193.025 58.325,186.2 58.325,185.9 ccw(c59.1,185.9) 59.1,185.125 60.089,185.125 cw(c60.089,184.8) 60.414,184.8 cw(c60.089,184.8) 60.089,184.475 57.085,184.475 ccw(c57.085,183.7) 56.31,183.7 ccw(c57.085,183.7) 57.085,182.925 60.089,182.925 cw(c60.089,182.6) 60.414,182.6 cw(c60.089,182.6) 60.089,182.275 57.085,182.275 ccw(c57.085,181.5) 56.31,181.5 ccw(c57.085,181.5) 57.085,180.725 58,180.725 cw(c58,180.4) 58.325,180.4 58.325,178.9 58.325,94.125 DD3.4@58.3,94.1 ; R137.1@58.153,194.003 58.313,194.163 58.313,197.363 59.55,198.6 59.603,198.653 ccw(c59.373,198.883) 59.603,199.113 58.885,199.831 cw(c59.115,200.06) 58.885,200.29 cw(c59.115,200.06) 59.345,200.29 60.063,199.572 ccw(c60.292,199.802) 60.522,199.572 61.3,200.35 62.003,201.053 62.003,202.217 X17.1@61.86,202.36
TX1: DD2.101 R10.1 | length 59.8
  Top w0.15: R10.1@73.35,31.2 92.05,31.2 107.25,46.4 107.25,63.72 DD2.101@108.83,65.3
TX1_N: DD3.7 R134.1 X16.2 | length 128.6
  Top w0.15: X16.2@41.355,204.9 42.365,205.91 cw(c42.582,205.693) 42.582,206 49.092,206 cw(c49.092,205.317) 49.575,205.8 50.356,205.019 cw(c48.56,203.223) 51.1,203.223 51.1,202.7 51.1,201.975 cw(c50.775,201.975) 50.775,201.65 49.925,201.65 ccw(c49.925,201.325) 49.6,201.325 ccw(c49.925,201.325) 49.925,201 50.775,201 cw(c50.775,200.675) 51.1,200.675 cw(c50.775,200.675) 50.775,200.35 49.946,200.35 ccw(c49.946,200.025) 49.621,200.025 ccw(c49.946,200.025) 49.946,199.7 50.775,199.7 cw(c50.775,199.375) 51.1,199.375 51.1,198.748 51.1,196.987 51.1,195.201 50.55,194.651 R134.1@50.55,194.601 50.55,194.551 51.075,194.026 51.075,172.239 56.825,166.489 56.825,94.125 DD3.7@56.8,94.1
TX1_P: DD3.6 R133.1 X16.1 | length 128.6
  Top w0.15: X16.1@40.085,202.36 40.085,204.434 cw(c42.441,204.434) 40.775,206.1 cw(c41.62,205.255) 41.62,206.45 49.092,206.45 cw(c49.092,205.317) 49.893,206.118 50.674,205.337 cw(c48.56,203.223) 51.55,203.223 51.55,196.801 51.55,195.15 52.05,194.65 R133.1@52.05,194.6 52.05,194.55 51.525,194.025 51.525,172.425 57.275,166.675 57.275,94.125 DD3.6@57.3,94.1
TX2: DD2.95 R14.1 | length 55.5
  Top w0.15: R14.1@73.35,33.5 90.75,33.5 104.85,47.6 104.85,64.3 DD2.95@105.85,65.3
TX2_N: DD3.13 R130.1 X15.2 | length 136.3
  Top w0.15: X15.2@19.635,204.9 19.55,204.815 19.55,201.459 15.641,197.55 15.641,194.789 19.354,191.076 19.533,191.076 19.536,191.079 20.095,191.079 R130.1@20.131,191.043 20.166,191.008 20.166,190.292 22.214,188.244 ccw(c24.01,190.04) 24.01,187.5 26.048,187.5 cw(c26.048,184.51) 28.162,186.624 30.394,184.393 30.54,184.246 31.001,183.785 cw(c30.453,183.237) 31.001,182.689 30.75,182.437 ccw(c30.98,182.208) 30.75,181.978 ccw(c30.98,182.208) 31.209,181.977 31.937,182.706 cw(c32.485,182.158) 33.033,182.706 cw(c32.485,182.158) 33.033,181.61 ; 33.032,181.609 32.305,180.882 ccw(c32.535,180.652) 32.305,180.422 ccw(c32.535,180.652) 32.765,180.422 33.017,180.674 cw(c33.565,180.126) 34.113,180.674 34.179,180.608 34.325,180.462 53.775,161.011 53.775,94.125 DD3.13@53.8,94.1
TX2_P: DD3.14 R129.1 X15.1 | length 136.3
  Top w0.15: X15.1@18.365,202.36 18.55,202.175 18.55,201.095 15.191,197.736 15.191,194.603 15.786,194.007 15.839,193.954 16.264,193.53 cw(c16.034,193.3) 16.264,193.07 15.789,192.595 ccw(c16.019,192.365) 15.789,192.135 ccw(c16.019,192.365) 16.249,192.135 16.724,192.61 cw(c16.953,192.381) 17.183,192.61 17.236,192.557 19.035,190.759 19.035,190.018 R129.1@19.07,189.983 19.105,189.947 19.848,189.947 cw(c19.848,189.905) 19.878,189.935 19.887,189.935 21.896,187.926 ccw(c24.01,190.04) 24.01,187.05 26.048,187.05 cw(c26.048,184.51) 27.844,186.306 30.076,184.074 30.222,183.928 30.683,183.467 cw(c30.453,183.237) 30.683,183.007 30.432,182.756 ccw(c30.98,182.208) 30.432,181.66 ccw(c30.98,182.208) 31.528,181.66 ; R129.1@18.929,189.841 18.893,189.877 18.893,190.407 R129.1@18.929,190.442 ; 31.528,181.66 32.255,182.387 cw(c32.485,182.158) 32.715,182.387 cw(c32.485,182.158) 32.716,181.928 31.987,181.2 ccw(c32.535,180.652) 31.987,180.104 ccw(c32.535,180.652) 33.083,180.104 ; 33.084,180.105 33.335,180.356 cw(c33.565,180.126) 33.794,180.356 33.86,180.29 34.007,180.143 41.632,172.518 41.95,172.2 53.325,160.825 53.325,94.125 DD3.14@53.3,94.1
TX3: DD2.87 R18.1 | length 54.6
  Top w0.15: R18.1@73.35,35.8 90.65,35.8 102.65,47.8 102.65,62.8 102.105,63.345 102.105,67.73 DD2.87@101.975,67.86
TX3_N: DD3.17 R126.1 X14.2 | length 130.9
  Top w0.15: X14.2@11.65,174.28 10.64,175.29 cw(c10.857,175.507) 10.55,175.507 10.55,182.017 cw(c11.233,182.017) 10.75,182.5 11.531,183.281 cw(c13.327,181.485) 13.327,184.025 13.55,184.025 13.625,184.025 14.275,184.025 cw(c14.275,183.7) 14.6,183.7 14.6,182.728 ccw(c14.925,182.728) 14.925,182.403 ccw(c14.925,182.728) 15.25,182.728 15.25,183.7 cw(c15.575,183.7) 15.575,184.025 cw(c15.575,183.7) 15.9,183.7 15.9,182.728 ccw(c16.225,182.728) 16.225,182.403 ccw(c16.225,182.728) 16.55,182.728 16.55,183.7 cw(c16.875,183.7) 16.875,184.025 17.375,184.025 17.45,184.025 21.145,184.025 cw(c21.144,183.8) 21.238,184.004 cw(c21.175,183.868) 21.241,184.003 21.244,184.001 cw(c21.178,183.867) 21.325,183.9 21.325,183.875 21.665,183.535 ccw(c21.75,183.621) R126.1@21.75,183.5 ccw(c21.75,183.621) 21.835,183.535 22.153,183.853 ccw(c22.1,183.906) 22.175,183.906 cw(c22.25,183.906) 22.197,183.959 22.219,183.981 cw(c22.325,183.875) 22.325,184.025 24.954,184.025 cw(c24.954,181.485) 26.75,183.281 51.825,158.206 51.825,94.125 DD3.17@51.8,94.1
TX3_P: DD3.16 R125.1 X14.1 | length 131.1
  Top w0.15: 11.213,183.599 cw(c13.327,181.485) 13.327,184.475 14.75,184.475 21.143,184.475 ccw(c21.144,184.7) 21.249,184.501 ccw(c21.178,184.633) 21.325,184.601 21.325,184.625 R125.1@21.75,185 cw(c21.75,184.879) 21.835,184.965 22.153,184.647 cw(c22.1,184.594) 22.175,184.594 ccw(c22.25,184.594) 22.197,184.541 22.219,184.519 ccw(c22.325,184.625) 22.325,184.475 24.954,184.475 cw(c24.954,181.485) 27.068,183.599 52.275,158.392 52.275,94.125 DD3.16@52.3,94.1 ; 11.213,183.599 10.432,182.818 ccw(c11.233,182.017) 10.1,182.017 10.1,174.545 ccw(c11.295,174.545) 10.45,173.7 ccw(c12.116,175.366) 12.116,173.01 X14.1@14.19,173.01
TX4: DD2.80 R21.1 | length 48.7
  Top w0.15: R21.1@73.35,38.1 89.65,38.1 100.35,48.8 100.35,63.36 DD2.80@98.4,65.31
TX4_N: DD3.22 R106.1 X9.2 | length 102
  Top w0.15: X9.2@11.65,152.58 11.73,152.5 15.086,152.5 19,148.586 19.678,148.586 20.25,148.586 25.186,148.586 25.7,149.1 R106.1@25.75,149.1 25.8,149.1 26.325,148.575 31.436,148.575 33.831,146.181 34.043,145.969 ccw(c34.273,146.198) 34.502,145.969 34.835,146.302 cw(c35.383,145.754) 35.931,146.302 cw(c35.383,145.754) 35.931,145.205 ; 35.931,145.205 34.48,143.754 ccw(c34.71,143.524) 34.48,143.295 ccw(c34.71,143.524) 34.939,143.294 36.391,144.746 cw(c36.939,144.198) 37.487,144.746 cw(c36.939,144.198) 37.487,143.65 ; 37.486,143.649 36.036,142.199 ccw(c36.266,141.969) 36.036,141.739 ccw(c36.266,141.969) 36.495,141.738 37.947,143.19 cw(c38.495,142.642) 39.043,143.19 cw(c38.495,142.642) 39.043,142.094 37.591,140.643 ccw(c37.821,140.413) 37.591,140.183 ccw(c37.821,140.413) 38.05,140.183 39.502,141.635 cw(c40.05,141.087) 40.598,141.635 cw(c40.05,141.087) 40.598,140.539 40.265,140.206 ccw(c40.495,139.976) 40.265,139.746 40.881,139.131 49.275,130.736 49.275,94.125 DD3.22@49.3,94.1
TX4_P: DD3.23 R105.1 X9.1 | length 101.6
  Top w0.15: X9.1@14.19,151.31 14.38,151.5 15.45,151.5 18.85,148.1 20.25,148.1 20.975,148.1 cw(c20.975,147.775) 21.3,147.775 21.3,146.625 ccw(c21.625,146.625) 21.625,146.3 ccw(c21.625,146.625) 21.95,146.625 21.95,147.775 cw(c22.275,147.775) 22.275,148.1 23.05,148.1 25.2,148.1 25.7,147.6 R105.1@25.75,147.6 25.8,147.6 26.325,148.125 31.25,148.125 33.513,145.862 33.724,145.651 ccw(c34.273,146.198) 34.821,145.65 35.154,145.983 cw(c35.383,145.754) 35.613,145.983 cw(c35.383,145.754) 35.614,145.524 34.162,144.072 ccw(c34.71,143.524) 34.162,142.976 ccw(c34.71,143.524) 35.258,142.976 ; 35.259,142.977 36.709,144.428 cw(c36.939,144.198) 37.169,144.428 cw(c36.939,144.198) 37.169,143.969 35.718,142.517 ccw(c36.266,141.969) 35.718,141.421 ccw(c36.266,141.969) 36.814,141.421 ; 36.814,141.422 38.265,142.872 cw(c38.495,142.642) 38.724,142.872 cw(c38.495,142.642) 38.725,142.413 37.273,140.961 ccw(c37.821,140.413) 37.273,139.865 ccw(c37.821,140.413) 38.369,139.865 ; 38.37,139.866 39.82,141.316 cw(c40.05,141.087) 40.28,141.316 cw(c40.05,141.087) 40.281,140.857 39.947,140.524 ccw(c40.495,139.976) 39.948,139.427 ; 39.948,139.427 40.562,138.812 48.825,130.55 48.825,94.125 DD3.23@48.8,94.1
TX5: DD2.74 R25.1 | length 45.8
  Top w0.15: R25.1@73.35,40.4 89.65,40.4 98.05,48.8 98.05,62.67 DD2.74@95.42,65.3
TX5_N: DD3.26 R102.1 X8.2 | length 85.6
  Top w0.15: X8.2@11.65,130.88 10.64,131.89 cw(c10.857,132.107) 10.55,132.107 10.55,138.617 cw(c11.233,138.617) 10.75,139.1 11.531,139.881 cw(c13.327,138.085) 13.327,140.625 14.05,140.625 14.775,140.625 cw(c14.775,140.3) 15.1,140.3 15.1,139.305 ccw(c15.425,139.305) 15.425,138.98 ccw(c15.425,139.305) 15.75,139.305 15.75,140.3 cw(c16.075,140.3) 16.075,140.625 cw(c16.075,140.3) 16.4,140.3 16.4,139.305 ccw(c16.725,139.305) 16.725,138.98 ccw(c16.725,139.305) 17.05,139.305 17.05,140.3 cw(c17.375,140.3) 17.375,140.625 18.039,140.625 21.044,140.625 cw(c21.044,140.4) 21.203,140.559 cw(c21.15,140.506) 21.225,140.506 ccw(c21.3,140.506) 21.247,140.453 21.565,140.135 ccw(c21.65,140.221) R102.1@21.65,140.1 ccw(c21.65,140.221) 21.735,140.135 22.053,140.453 ccw(c22,140.506) 22.075,140.506 cw(c22.15,140.506) 22.097,140.559 ; 22.097,140.559 22.119,140.581 cw(c22.225,140.475) 22.225,140.625 24.836,140.625 cw(c24.836,138.085) 26.633,139.881 47.325,119.189 47.325,94.125 DD3.26@47.3,94.1
TX5_P: DD3.25 R101.1 X8.1 | length 85.7
  Top w0.15: X8.1@14.19,129.61 12.116,129.61 cw(c12.116,131.966) 10.45,130.3 cw(c11.295,131.145) 10.1,131.145 10.1,138.617 cw(c11.233,138.617) 10.432,139.418 11.213,140.199 cw(c13.327,138.085) 13.327,141.075 21.044,141.075 ccw(c21.044,141.3) 21.203,141.141 ccw(c21.15,141.194) 21.225,141.194 cw(c21.3,141.194) 21.247,141.247 21.565,141.565 cw(c21.65,141.479) R101.1@21.65,141.6 cw(c21.65,141.479) 21.735,141.565 22.053,141.247 cw(c22,141.194) 22.075,141.194 ccw(c22.15,141.194) 22.097,141.141 22.119,141.119 ccw(c22.225,141.225) 22.225,141.075 24.836,141.075 cw(c24.836,138.085) 26.951,140.199 47.775,119.375 47.775,94.125 DD3.25@47.8,94.1
TX6: DD2.66 R29.1 TP1.1 | length 45.8
  Top w0.15: R29.1@73.35,42.7 75.85,42.7 89.85,42.7 95.65,48.5 95.65,62.3 93.165,64.785 93.165,66.23 DD2.66@91.545,67.85